# Altium PCB CubliV2PCB.PcbDoc (part 1 of 2)
Units mm, origin at the board's own origin, x right, y up, seen from the top; angles counter-clockwise.
Board outline 85.09 x 80.51 mm, 2 copper layers (Top Layer, Bottom Layer); 107 components, 65 nets, 363 pads, 141 vias.
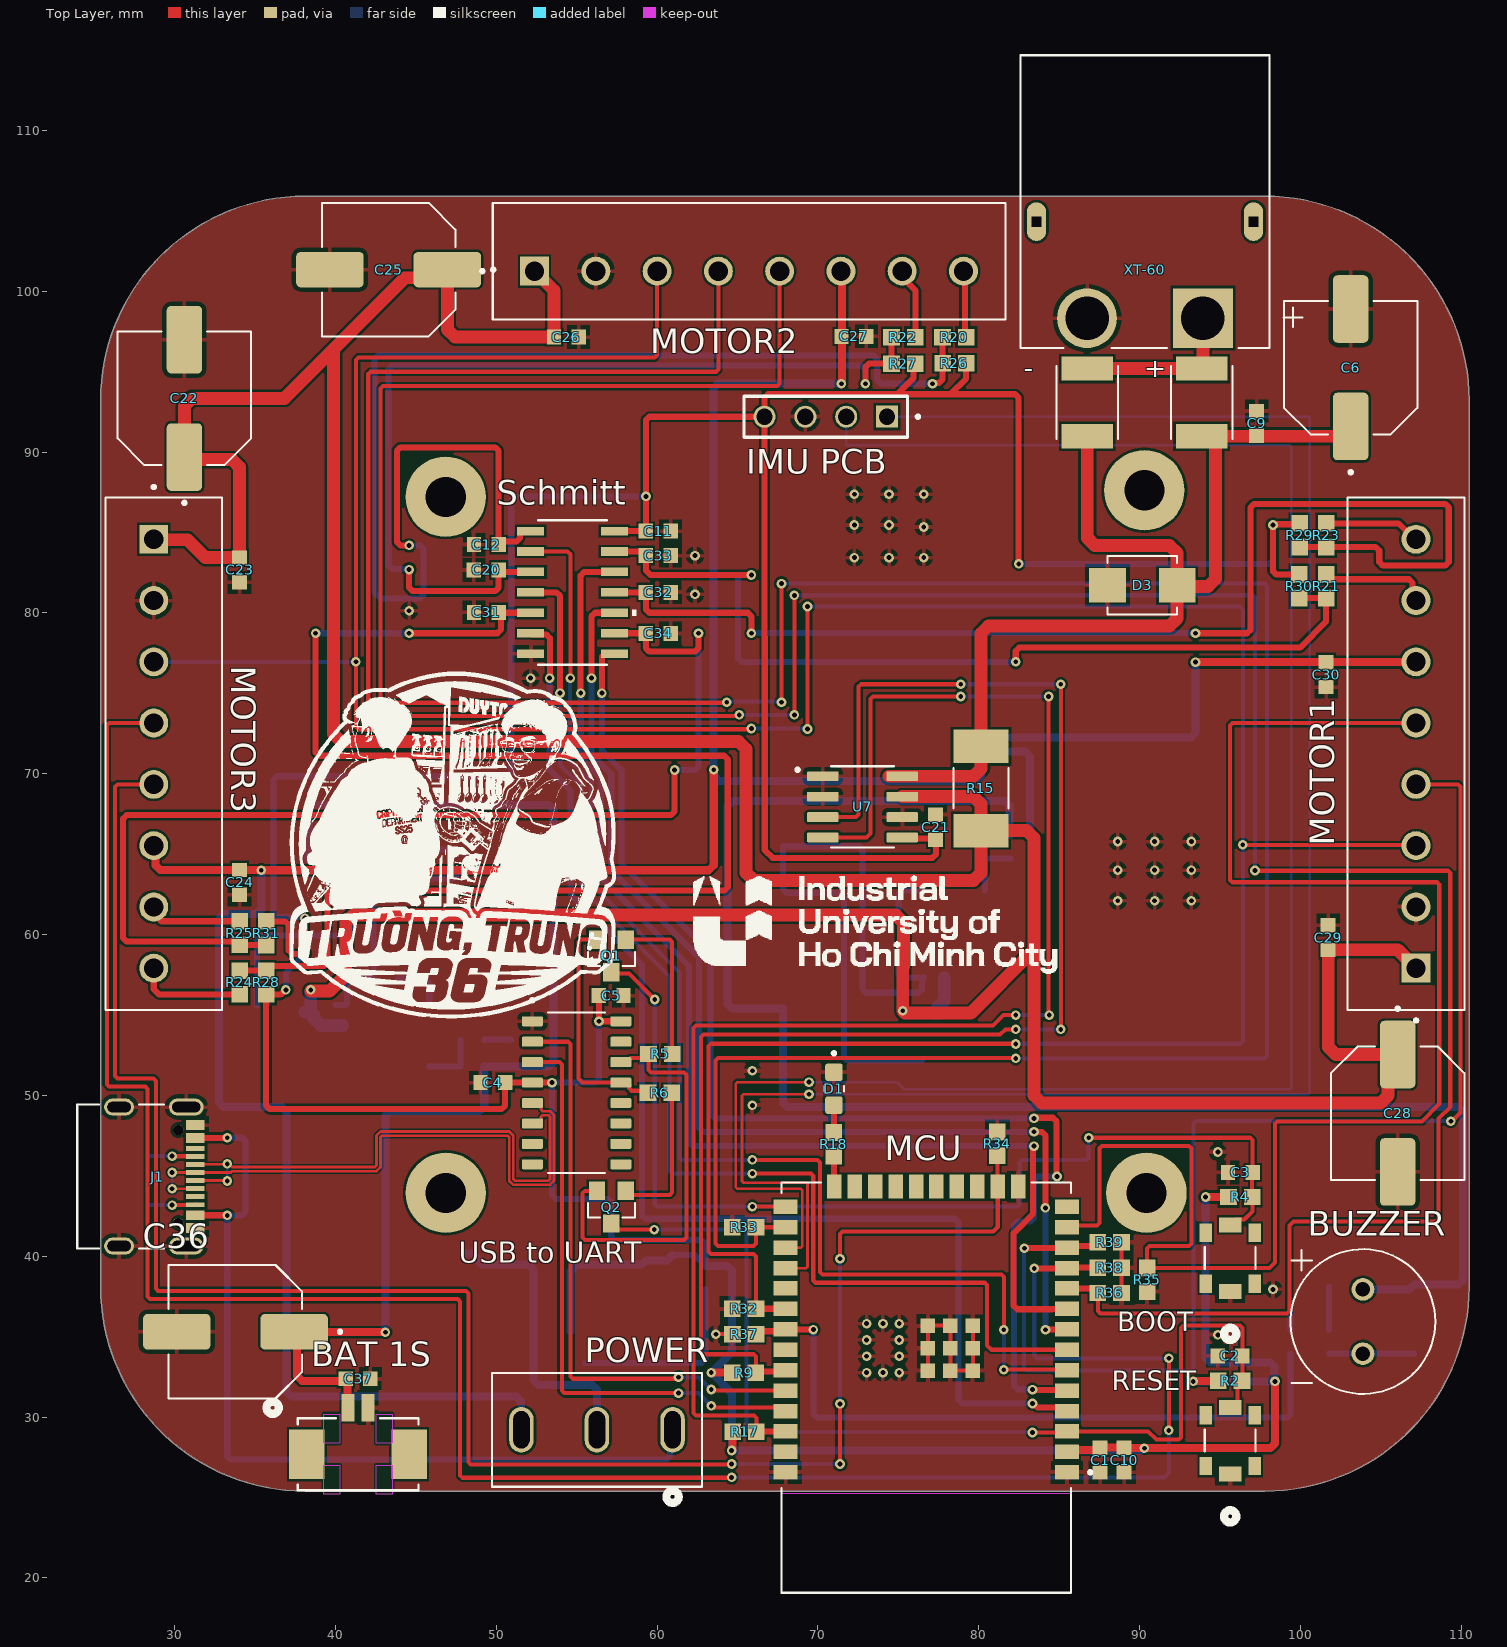
[diagram p0: Top Layer view]
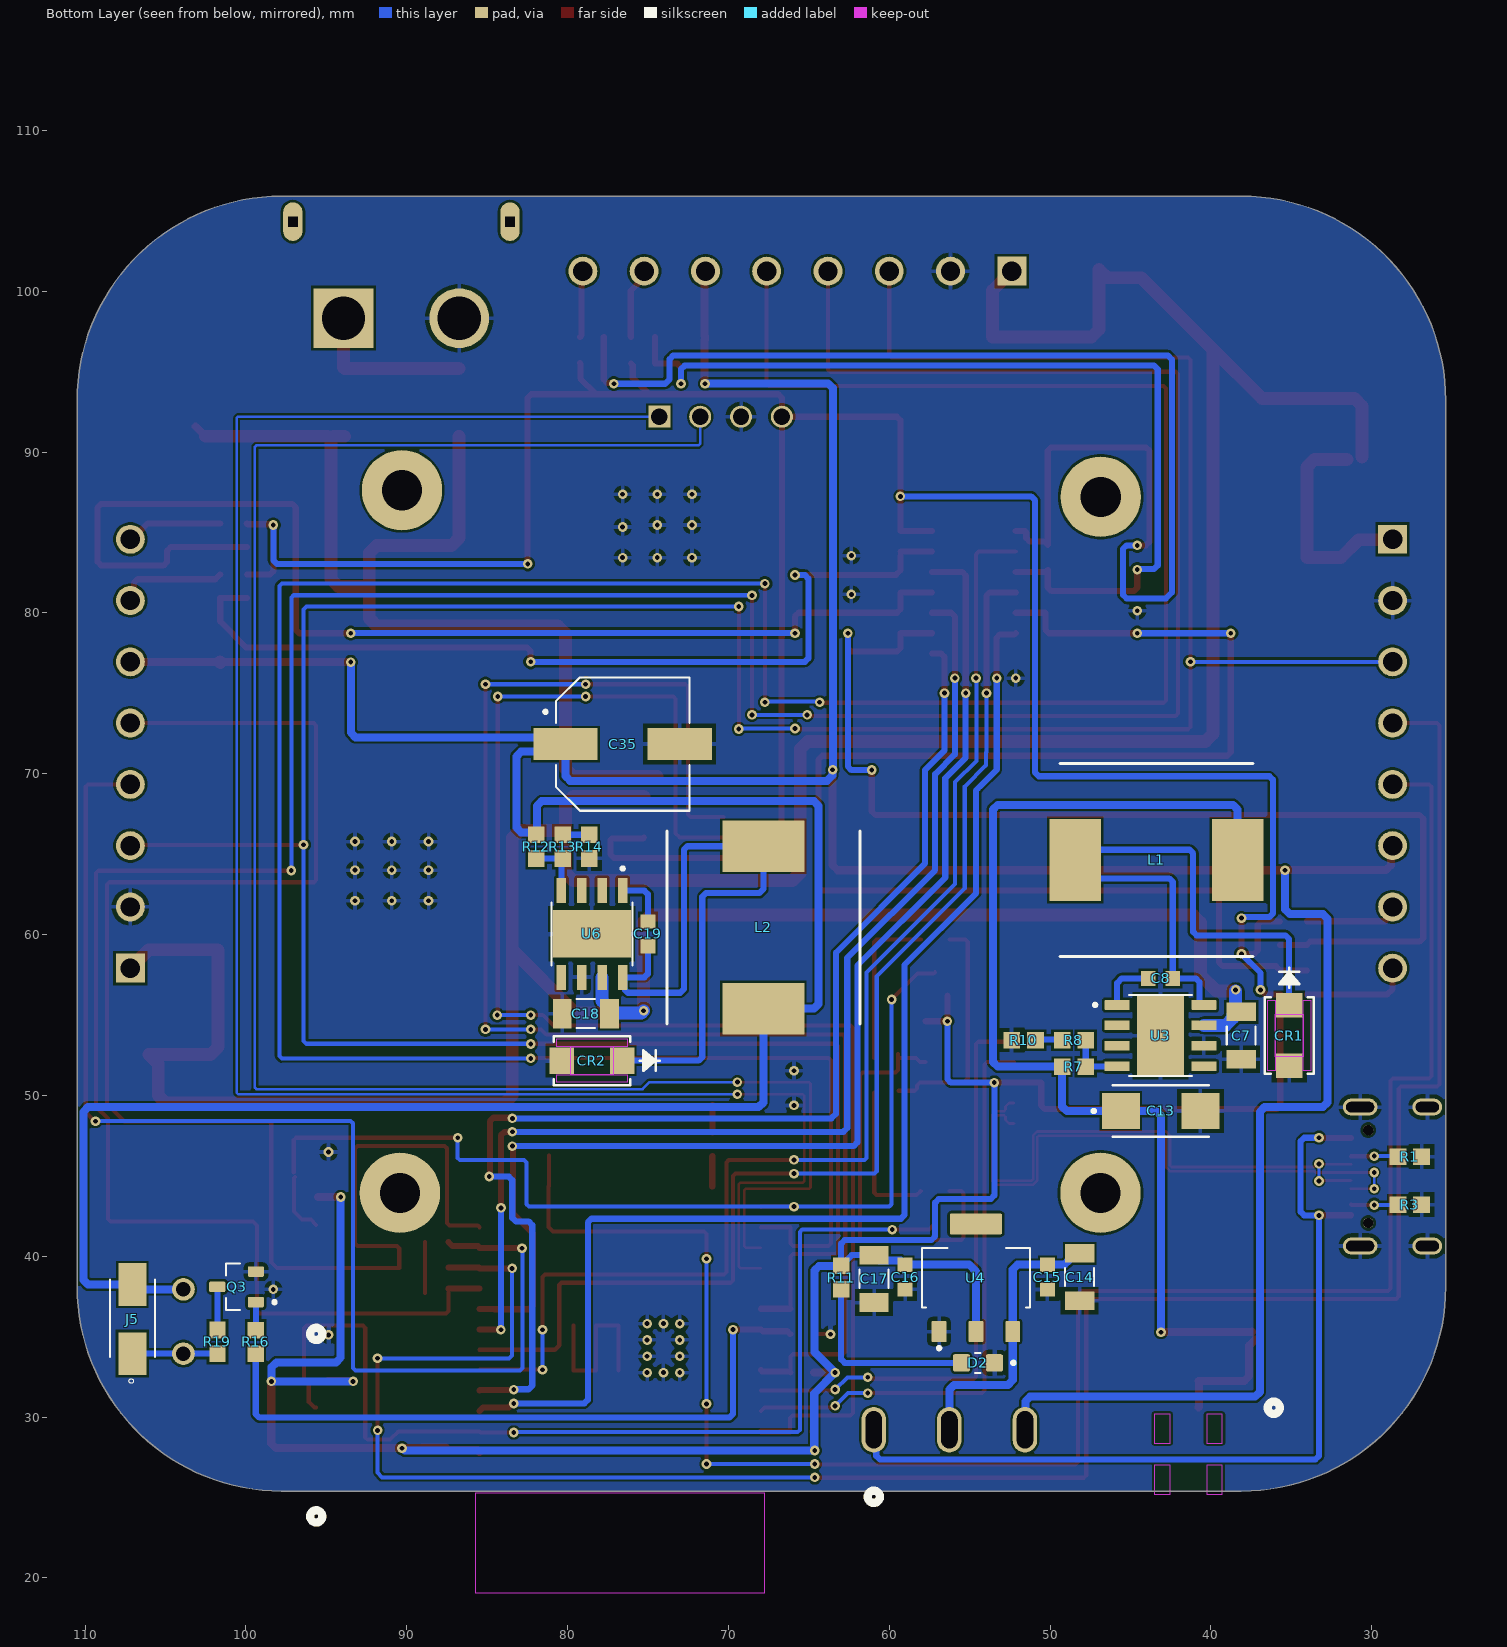
[diagram p1: Bottom Layer view, seen from below]
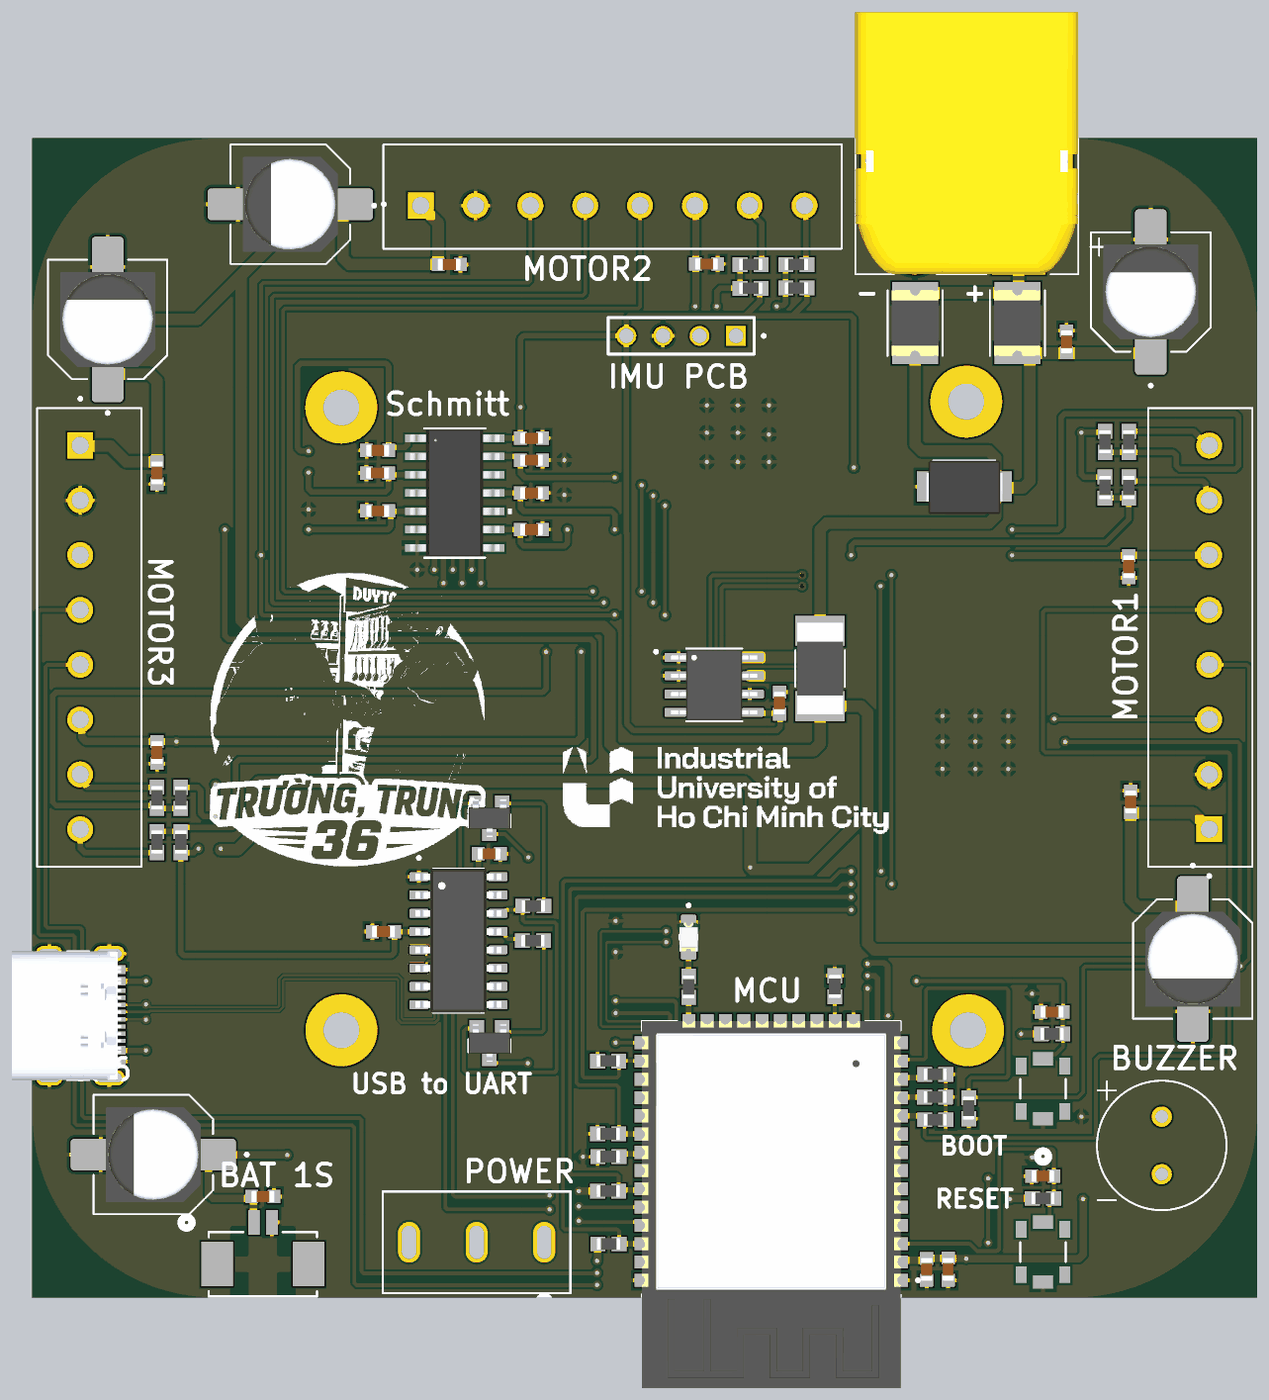
[diagram p2: 3D render of the assembled board from above, using the file's embedded part models]
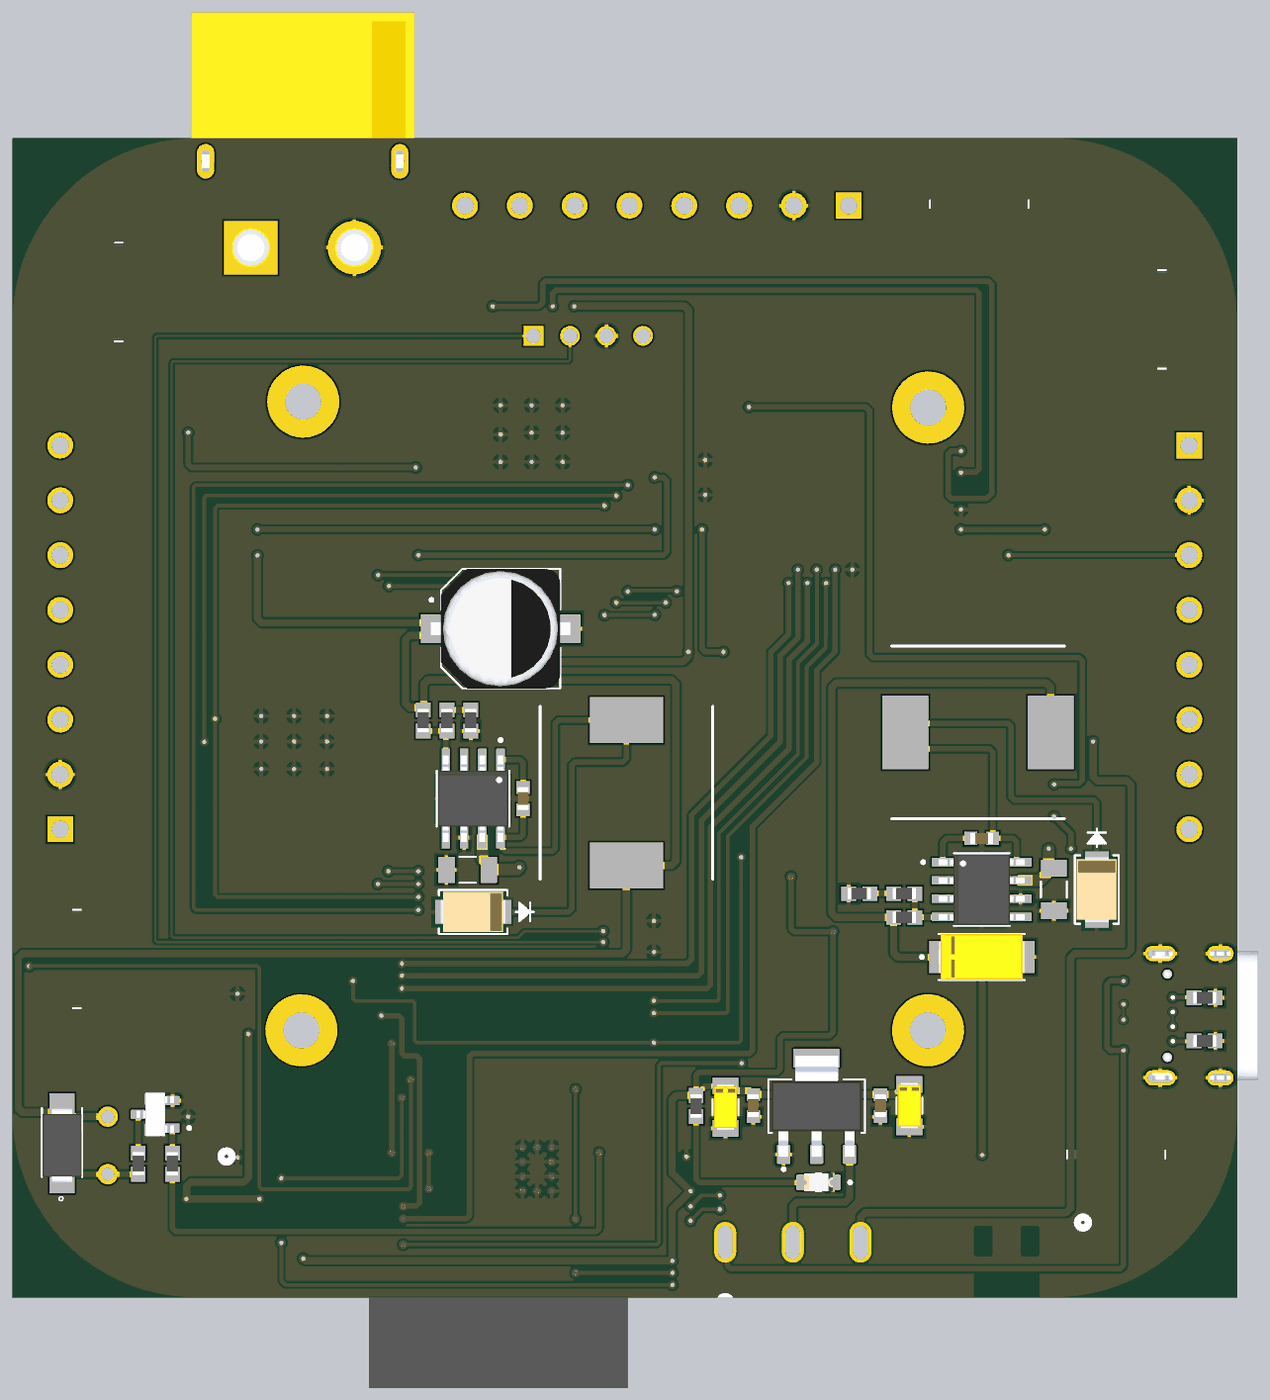
[diagram p3: 3D render of the assembled board from below, using the file's embedded part models]

## Layer stack, top to bottom
Top Solder: solder mask 0.0102, Solder Resist, Dk 3.5
Top Layer: signal copper 0.0356
Dielectric 1: dielectric 0.32, FR-4, Dk 4.8
Bottom Layer: signal copper 0.0356
Bottom Solder: solder mask 0.0102, Solder Resist, Dk 3.5

## Board outline
38.1,25.4 97.79,25.4 ccw(c97.79,38.1) 110.49,38.1 110.49,93.218 ccw(c97.797,93.218) 97.797,105.911 38.093,105.911 ccw(c38.093,93.218) 25.4,93.218 25.4,38.1 ccw(c38.1,38.1)

## Design rules (kind name [scope] priority, off if disabled: settings)
Clearance DiffpairClearance [InDifferentialPair('USB')] p1: gap=0.083 ignorepadtopadclearanceinfootprint=FALSE
Clearance SignalClearance [Not(InDifferentialPair('USB'))] p2: gap=0.15 ignorepadtopadclearanceinfootprint=FALSE
DiffPairsRouting [All] p1: maxlimit=0.083 minlimit=0.083 mostfreqgap=0.083 toplayer_minwidth=0.17 toplayer_maxwidth=0.17 toplayer_prefwidth=0.17 bottomlayer_minwidth=0.17 bottomlayer_maxwidth=0.17 bottomlayer_prefwidth=0.17 impedanceprofiledriven=TRUE impedanceprofileid={630FC3B4-62B8-4105-8E13-0E606457B353} impedanceprofilevalue=90.000000 maxuncoupledlength=12.7
HoleSize [All] p1: absolutevalues=TRUE maxlimit=3.5 minlimit=0.025 maxpercent=80.000 minpercent=20.000
HoleToHoleClearance [All] p1: gap=0.1 allowstackedmicrovias=TRUE
MinimumSolderMaskSliver [All] p1: minsoldermaskwidth=0.1
PolygonConnect [All] p1: connectstyle=Relief reliefconductorwidth=0.254 reliefentries=4 polygonreliefangle="90 Angle" airgapwidth=0.254
RoutingVias [All] p1: holewidth=0.711 width=1.27 viastyle="Through Hole" minholewidth=0.711 minwidth=1.27 maxholewidth=0.711 maxwidth=1.27
SilkToSolderMaskClearance [IsPad] p1: minsilkscreentomaskgap=0.1 clearancetoexposedcopper=TRUE
SolderMaskExpansion ViaTenting [IsVia] p1: expansion=0.102 istentingtop=TRUE
SolderMaskExpansion [All] p2: expansion=0.102 istentingtop=FALSE
Width Pow [InNet('+12')or InNet('+12_LOAD')or InNet('+3.3_MCU')or InNet('+4')or InNet('+5')or InNet('POWER')or InNet('NetF1_2')] p1: maxlimit=0.8 minlimit=0.254 preferedwidth=0.38 minimp=50.000000 maximp=50.000000 favimp=50.000000
Width Signal [Not(InNet('+12')or InNet('+12_LOAD')or InNet('+3.3_MCU')or InNet('+4')or InNet('+5')or InNet('POWER')or InNet('NetF1_2'))] p2: maxlimit=0.38 minlimit=0.152 preferedwidth=0.254 minimp=50.000000 maximp=50.000000 favimp=50.000000
25 further rules are at their usual default settings.

## Classes and differential pairs
component class Power: 2 C7 C8 C13 C14 C15 C16 C17 C18 C19 C21 C35 CR1 CR2 D2 L1 L2 POWER R7 R8 R10 R11 R12 R13 R14 R15 U4 U6 U7
component class MCU: BOOT BUZZER C1 C2 C3 C4 C5 C10 C11 C12 C20 C31 C32 C34 D1 J1 J5 MCU Q1 Q2 Q3 R1 R2 R3 R4 R5 R6 R9 R16 R17 R18 R19 R20 R21 R22 R23 R24 R25 R26 R27 R28 R29 R30 R31 R32 R33 R34 R35 R36 R37 R38 R39 RESET Schmitt "USB to UART"
component class Connector: + - "BAT 1S" C6 C9 C22 C23 C24 C25 C26 C27 C28 C29 C30 C36 C37 D3 "IMU PCB" MOTOR1 MOTOR2 MOTOR3 XT-60
differential pair USB: +USB_P -USB_N

## Components (designator, comment, footprint, x,y, rotation, side; value= is the part's Value field where it differs from the comment)
+ "16V 2.5A" FUSER_MF-MSMF250/16X-2 93.853,93.091 r90 top (schematic designator F2)
- "16V 2.5A" FUSER_MF-MSMF250/16X-2 86.741,93.091 r90 top (schematic designator F1)
"BAT 1S" "2 Pin 1.25 SMD" CONN_532610001-SD_02_MOL 41.402,27.686 r180 top (schematic designator J7)
BOOT "BOOT" "PTS820 J25K SMTR LFS_CNK" 95.631,39.878 r90 top (schematic designator SW3)
BUZZER "Passive Buzzer 9mm" XDCR_AT-0927-TT-2-R 103.886,35.941 r0 top (schematic designator LS1)
C1 "100nF" CAPC1608X90N 87.55,27.323 r90 top
C2 "100nF" CAPC1608X90N 95.62,33.812 r0 top
C3 "100nF" CAPC1608X90N 96.266,45.212 r0 top
C4 "100nF" CAPC1608X90N 49.784,50.8 r0 top
C5 "10uF" CAPC1608X90N 57.138,56.206 r180 top
C6 "100uF" CAPAE830X1000N 103.124,95.25 r90 top
C7 "22uF 25V" CAPC3216X229N 38.115,53.724 r90 bottom
C8 "100nF" CAPC1608X90N 43.133,57.277 r0 bottom
C9 "100nF" CAPC1608X90N 97.274,91.788 r270 top
C10 "10uF" CAPC1608X90N 89.037,27.332 r90 top
C11 "100nF" CAPC1608X90N 60.071,85.09 r180 top
C12 "1nF" CAPC1608X90N 49.378,84.243 r180 top
C13 "220uF" CAPPM6032X280N 43.125,49.033 r180 bottom
C14 "10uF" CAPC3216X110N 48.161,38.709 r270 bottom
C15 "100nF" CAPC1608X90N 50.165,38.705 r90 bottom
C16 "100nF" CAPC1608X90N 59.014,38.709 r90 bottom
C17 "10uF" CAPC3216X110N 60.942,38.597 r270 bottom
C18 "22uF 25V" CAPC3216X229N 78.867,55.087 r180 bottom
C19 "100nF" CAPC1608X90N 75.004,60.043 r90 bottom
C20 "1nF" CAPC1608X90N 49.374,82.672 r180 top
C21 "100nF" CAPC1608X90N 77.309,66.678 r270 top
C22 "100uF" CAPAE830X1000N 30.607,93.345 r90 top
C23 "100nF" CAPC1608X90N 34.036,82.677 r90 top
C24 "100nF" CAPC1608X90N 34.036,63.246 r90 top
C25 "100uF" CAPAE830X1000N 43.307,101.346 r180 top
C26 "100nF" CAPC1608X90N 54.356,97.155 r180 top
C27 "100nF" CAPC1608X90N 72.239,97.195 r180 top
C28 "100uF" CAPAE830X1000N 106.045,48.895 r270 top
C29 "100nF" CAPC1608X90N 101.727,59.817 r270 top
C30 "100nF" CAPC1608X90N 101.596,76.161 r90 top
C31 "1nF" CAPC1608X90N 49.382,80.034 r180 top
C32 "1nF" CAPC1608X90N 60.071,81.28 r0 top
C33 "1nF" CAPC1608X90N 60.071,83.566 r0 top
C34 "1nF" CAPC1608X90N 60.071,78.732 r0 top
C35 "330uF" CAP_EEEFP1V101AP 76.581,71.851 r180 bottom
C36 "100uF" CAPAE830X1000N 33.782,35.306 r180 top
C37 "100nF" CAPC1608X90N 41.402,32.385 r180 top
CR1 "SSA34" CR_A34-E35AT_VIS 35.132,53.721 r270 bottom
CR2 "SSA34" CR_A34-E35AT_VIS 78.486,52.166 r0 bottom
D1 "MCU LED" LEDSC125X200X90-2N 70.993,50.419 r270 top
D2 "MCU LED" LEDSC125X200X90-2N 54.483,33.371 r0 bottom
D3 "SMBJ15A" DIOM4336X265N 90.17,81.724 r0 top
"IMU PCB" "FPGA Connector" SAMTEC_TSW-104-07-T-S-LL 74.295,92.202 r180 top (schematic designator J8)
J1 "USB Type-C" AMPHENOL_10155435-00011LF 26.543,44.958 r270 top
J5 "SS14" SMA 107.061,35.941 r90 bottom
L1 "22uH" INDPM120120X800N 43.387,64.643 r180 bottom
L2 "22uH" INDPM120120X800N 67.827,60.448 r270 bottom
MCU "ESP32-WROOM-32E_(4MB)" XCVR_ESP32-WROOM-32E_(4MB) 76.735,31.827 r180 top (schematic designator U1)
MOTOR1 "Motor 3" PHOENIX_1803484 110.188,55.312 r90 top (schematic designator J4)
MOTOR2 "Motor 1" PHOENIX_1803484 49.779,98.254 r0 top (schematic designator J2)
MOTOR3 "Motor 2" PHOENIX_1803484 25.702,87.182 r270 top (schematic designator J3)
POWER "MTS-103" MTS-103_JCV 60.961,29.21 r90 top (schematic designator SW1)
Q1 "S8050" SOT-23 57.15,58.674 r180 top
Q2 "S8050" SOT-23 57.15,43.053 r180 top
Q3 "MMBT3904" TRANS_MMBT3904 100.584,38.1 r0 bottom
R1 "5K1" RESC1607X60N 27.634,46.198 r0 bottom
R2 "10K" RESC1607X60N 95.631,32.258 r0 top
R3 "5K1" RESC1607X60N 27.634,43.211 r180 bottom
R4 "10K" RESC1607X60N 96.266,43.688 r0 top
R5 "10K" RESC1607X60N 60.198,52.578 r0 top
R6 "10K" RESC1607X60N 60.171,50.165 r0 top
R7 "10K" RESC1607X60N 48.515,51.788 r180 bottom
R8 "3K9" RESC1607X60N 48.516,53.434 r0 bottom
R9 "4K7" RESC1607X60N 65.405,32.766 r180 top
R10 "510" RESC1607X60N 51.646,53.436 r0 bottom
R11 "220" RESC1607X60N 62.992,38.678 r270 bottom
R12 "10K" RESC1607X60N 81.956,65.473 r270 bottom
R13 "3K" RESC1607X60N 80.305,65.473 r90 bottom
R14 "220" RESC1607X60N 78.654,65.473 r270 bottom
R15 "0.01" RESC6331X85N 80.137,69.088 r90 top
R16 "1K" RESC1607X60N 99.388,34.671 r90 bottom
R17 "4K7" RESC1607X60N 65.434,29.094 r0 top
R18 "220" RESC1607X60N 70.993,46.963 r90 top
R19 "51" RESC1607X60N 101.769,34.679 r270 bottom
R20 "1K" RESC1607X60N 78.486,97.155 r180 top
R21 "1K" RESC1607X60N 101.6,81.661 r90 top
R22 "1K" RESC1607X60N 75.311,97.155 r180 top
R23 "1K" RESC1607X60N 101.6,84.836 r90 top
R24 "1K" RESC1607X60N 34.036,57.023 r90 top
R25 "1K" RESC1607X60N 34.036,60.098 r90 top
R26 "10K" RESC1607X60N 78.487,95.528 r180 top
R27 "10K" RESC1607X60N 75.311,95.504 r180 top
R28 "10K" RESC1607X60N 35.687,57.023 r90 top
R29 "10K" RESC1607X60N 99.949,84.836 r270 top
R30 "10K" RESC1607X60N 99.935,81.661 r270 top
R31 "10K" RESC1607X60N 35.693,60.09 r270 top
R32 "10K" RESC1607X60N 65.41,36.743 r180 top
R33 "10K" RESC1607X60N 65.407,41.807 r180 top
R34 "10K" RESC1607X60N 81.153,46.99 r90 top
R35 "10K" RESC1607X60N 90.468,38.53 r270 top
R36 "10K" RESC1607X60N 88.138,37.719 r0 top
R37 "10K" RESC1607X60N 65.417,35.16 r180 top
R38 "10K" RESC1607X60N 88.134,39.297 r0 top
R39 "10K" RESC1607X60N 88.141,40.878 r0 top
RESET "RESET" "PTS820 J25K SMTR LFS_CNK" 95.631,28.532 r90 top (schematic designator SW2)
Schmitt "74LVC14AD" SOT108-1_NXP 54.737,81.28 r0 top (schematic designator U5)
U3 "TPS5430" CONV_TPS5430DDAR 43.133,53.721 r180 bottom
U4 "AMS1117-3.3" SOT229P700X180-4N 54.61,38.662 r180 bottom
U6 "TPS5430" CONV_TPS5430DDAR 78.486,60.04 r270 bottom
U7 "INA219AIDR" SOIC127P599X175-8N 72.771,67.945 r0 top
"USB to UART" "CH340C" SOIC127P600X180-16N 54.991,50.165 r0 top (schematic designator U2)
XT-60 "XT60PW-M" AMASS_XT60PW-M 90.334,104.329 r180 top (schematic designator J6)

## Footprints (in the part's own frame and the unit in brackets; to place one, negate y for a bottom-side part, rotate by r counter-clockwise, add the part's x,y. Pads: shape width x height; smd on the part's side, far side on the other; paste and mask are expansions set on the pad)
AMASS_XT60PW-M [mm]
  rect 3.716x3.716 / inner round 3.716 / far side rect 3.716x3.716 hole 2.7 mask+0.102: 1(-3.6,6)
  round 3.716 hole 2.7 mask+0.102: 2(3.6,6)
  oval 1.2x2.4 hole 0.6 square mask+0.102: SH1(-6.75,0) SH2(6.75,0)
  silkscreen extent -9.8,-10.35 7.75,7.85, body extent -7.75,-10.35 7.75,7.85, height 8.4
AMPHENOL_10155435-00011LF [mm]
  rect 0.6x1.15 smd: A1_B12(-3.2,4.745) A4_B9(-2.4,4.745) B1_A12(3.2,4.745) B4_A9(2.4,4.745)
  rect 0.3x1.15 smd: A5(-1.25,4.745) A6(-0.25,4.745) A7(0.25,4.745) A8(1.25,4.745) B5(1.75,4.745) B6(0.75,4.745) B7(-0.75,4.745) B8(-1.75,4.745)
  oval 1.05x2.15 hole 0.65 slot 1.75 at 90 deg: SH1(-4.32,4.18) SH2(4.32,4.18)
  oval 1.05x1.85 hole 0.65 slot 1.45 at 90 deg: SH3(-4.32,0) SH4(4.32,0)
  round 0.65 hole 0.65 unplated: ""(-2.89,3.68) ""(2.89,3.68)
  silkscreen extent -4.47,-2.6 4.47,2.79, body extent -4.47,-2.6 4.47,5, height 3.26
CAP_EEEFP1V101AP [mm]
  rect 4x2 smd paste+0 mask+0.102: 1(-3.55,0) 2(3.55,0)
  silkscreen extent -4.9,-4.15 4.15,4.15, body extent -4.85,-4.15 4.85,4.15, height 10.2
CAPAE830X1000N [mm]
  rrect25% 4.2x2.2 smd: 1(-3.65,0) 2(3.65,0)
  silkscreen extent -6.6,-4.15 4.15,4.15, body extent -3.5,-3.3 3.5,3.3, height 7.55
CAPC1608X90N [mm]
  rect 0.89x0.93 smd: 1(-0.77,0) 2(0.77,0)
  body extent -0.8,-0.4 0.8,0.4, height 0.9
CAPC3216X110N [mm]
  rect 1.16x1.82 smd: 1(-1.475,0) 2(1.475,0)
  silkscreen extent -0.57,-0.9 0.57,0.9, body extent -1.6,-0.8 1.6,0.8, height 1.8
CAPC3216X229N [mm]
  rect 1.16x1.82 smd: 1(-1.475,0) 2(1.475,0)
  silkscreen extent -0.57,-0.9 0.57,0.9
CAPPM6032X280N [mm]
  rect 2.37x2.21 smd paste+0 mask+0.102: 1(-2.475,0) 2(2.475,0)
  silkscreen extent -4.26,-1.6 3,1.6, body extent -3,-1.6 3,1.6, height 2.8
CONN_532610001-SD_02_MOL [mil]
  rect 32x67 smd paste+0 mask+4.02: 1(24.61,-114.35) 2(-24.61,-114.35)
  rect 87x122 smd paste+0 mask+4.02: 3(-125,-0.18) 4(125,-0.18)
  Keep-Out Layer region: 83.48,-98.67 44.48,-98.67 44.48,-27.67 83.48,-27.67
  Keep-Out Layer region: -44.48,-98.67 -83.48,-98.67 -83.48,-27.67 -44.48,-27.67
  Keep-Out Layer region: 83.48,27.32 44.48,27.32 44.48,98.32 83.48,98.32
  Keep-Out Layer region: -44.48,27.32 -83.48,27.32 -83.48,98.32 -44.48,98.32
  silkscreen extent -148,-129 224,88
CONV_TPS5430DDAR [mm]
  rrect10% 1.55x0.6 smd mask+0: 1(-2.7,1.905) 2(-2.7,0.635) 3(-2.7,-0.635) 4(-2.7,-1.905) 5(2.7,-1.905) 6(2.7,-0.635) 7(2.7,0.635) 8(2.7,1.905)
  rect 2.95x4.9 smd paste-3 mask+0: 9(0,0)
  silkscreen extent -4.17,-2.52 1.95,2.52, body extent -3,-2.45 3,2.45, height 1.7
CR_A34-E35AT_VIS [mil]
  rect 60x65 smd paste+0 mask+0: 1(-74.02,0) 2(74.02,0)
  Top Layer keep-out region: -52.02,-34.5 -52.02,34.5 52.02,34.5 52.02,-34.5
  Top Layer keep-out region: -86.5,34.5 -86.5,53 86.5,53 86.5,34.5
  Top Layer keep-out region: -86.5,-53 -86.5,-34.5 86.5,-34.5 86.5,-53
  silkscreen extent -166,-60 94,60, body extent -89,-55 89,55, height 92
DIOM4336X265N [mm]
  rect 2.28x2.12 smd paste+0 mask+0.102: 1(-2.165,0) 2(2.165,0)
  silkscreen extent -2.16,-1.81 2.16,1.81, body extent -2.7,-1.9 2.7,1.8, height 2.19
FUSER_MF-MSMF250/16X-2 [mm]
  rect 1.5x3.2 smd: 1(-2.1,0) 2(2.1,0)
  silkscreen extent -2.27,-1.91 2.27,1.91, body extent -2.27,-1.62 2.27,1.62, height 0.85
INDPM120120X800N [mm]
  rect 3.2x5.1 smd: 1(-5.05,0) 2(5.05,0)
  silkscreen extent -6,-6 6,6
LEDSC125X200X90-2N [mm]
  rrect25% 1.07x1.08 smd: A(1.025,0) C(-1.025,0)
  silkscreen extent -2.3,-0.63 0.17,0.63, body extent -1,-0.63 1,0.63, height 0.7
MTS-103_JCV [mil]
  oval 111x60 hole 40 slot 91 at 0 deg paste+0 mask+0: 1(0,0) 2(0,185.04) 3(0,370.08)
  silkscreen extent -179,-72 139,442
PHOENIX_1803484 [mm]
  rect 1.8x1.8 / inner round 1.8 / far side rect 1.8x1.8 hole 1.2: 01(2.6,3)
  round 1.8 hole 1.2: 02(6.41,3) 03(10.22,3) 04(14.03,3) 05(17.84,3) 06(21.65,3) 07(25.46,3) 08(29.27,3)
  silkscreen extent -0.75,0 31.87,7.25
"PTS820 J25K SMTR LFS_CNK" [mil]
  rect 37x55 smd paste+0 mask+0: 1(-81.69,0) 2(81.69,0)
  rect 45x30 smd paste+0 mask+0: 3(-62.01,60.04) 4(62.01,60.04) 5(-62.01,-60.04) 6(62.01,-60.04)
  silkscreen extent -200,-62 26,62
RESC1607X60N [mm]
  rect 1.04x1.02 smd: 1(-0.735,0) 2(0.735,0)
  body extent -0.8,-0.4 0.8,0.4, height 0.55
RESC6331X85N [mm]
  rect 2.08x3.44 smd: 1(-2.616,0) 2(2.616,0)
  silkscreen extent -1.26,-1.72 1.26,1.72, body extent -3.17,-1.59 3.17,1.59, height 0.85
SAMTEC_TSW-104-07-T-S-LL [mm]
  rect 1.37x1.37 hole 1.02: 01(0,0)
  round 1.37 hole 1.02: 02(2.54,0) 03(5.08,0) 04(7.62,0)
  silkscreen extent -2.02,-1.27 8.89,1.27
SMA [mm]
  rect 2.65x1.75 smd paste+0 mask+0.102: P1(-2,0) P2(2.3,0)
  silkscreen extent -3.84,-1.4 2.6,1.4, body extent -2.6,-1.36 2.6,1.36, height 2.5
SOIC127P599X175-8N [mm]
  rrect25% 1.97x0.6 smd paste+0 mask+0.102: 1(-2.47,1.905) 2(-2.47,0.635) 3(-2.47,-0.635) 4(-2.47,-1.905) 5(2.47,-1.905) 6(2.47,-0.635) 7(2.47,0.635) 8(2.47,1.905)
  silkscreen extent -4.14,-2.52 1.95,2.52, body extent -3,-2.45 3,2.45, height 1.75
SOIC127P600X180-16N [mm]
  rrect25% 1.31x0.62 smd: 1(-2.75,4.445) 2(-2.75,3.175) 3(-2.75,1.905) 4(-2.75,0.635) 5(-2.75,-0.635) 6(-2.75,-1.905) 7(-2.75,-3.175) 8(-2.75,-4.445) 9(2.75,-4.445) 10(2.75,-3.175) 11(2.75,-1.905) 12(2.75,-0.635) 13(2.75,0.635) 14(2.75,1.905) 15(2.75,3.175) 16(2.75,4.445)
  silkscreen extent -2.85,-5 1.78,5.85, body extent -3,-5 3,5, height 1.8
SOT108-1_NXP [mil]
  rect 66.56x20.97 smd paste+0 mask+0: 1(-102.5,150) 2(-102.5,100) 3(-102.5,50) 4(-102.5,0) 5(-102.5,-50) 6(-102.5,-100) 7(-102.5,-150) 8(102.5,-150) 9(102.5,-100) 10(102.5,-50) 11(102.5,0) 12(102.5,50) 13(102.5,100) 14(102.5,150)
  silkscreen extent -84,-177 156,177, body extent -122,-172 122,172, height 69
SOT229P700X180-4N [mm]
  rrect15% 0.93x1.31 smd: 1(-2.29,-3.345) 2(0,-3.345) 3(2.29,-3.345)
  rrect15% 3.24x1.31 smd: 4(0,3.345)
  silkscreen extent -3.36,-4.47 3.36,1.86, body extent -3.15,-3.5 3.15,3.5, height 1.8
SOT-23 [mil]
  rect 40x45 smd: 1(-35,-40) 2(35,-40) 3(0,40)
  silkscreen extent -58,-10 58,25, body extent -57,-51 57,51, height 55
TRANS_MMBT3904 [mm]
  rrect25% 1x0.65 smd paste+0 mask+0.102: 1(-1.2,0.95) 2(-1.2,-0.95) 3(1.2,0)
  silkscreen extent -2.46,-1.45 0.65,1.45, body extent -1.3,-1.52 1.3,1.52, height 1.3
XCVR_ESP32-WROOM-32E_(4MB) [mm]
  rect 1.5x0.9 smd: 1(-8.75,5.26) 2(-8.75,3.99) 3(-8.75,2.72) 4(-8.75,1.45) 5(-8.75,0.18) 6(-8.75,-1.09) 7(-8.75,-2.36) 8(-8.75,-3.63) 9(-8.75,-4.9) 10(-8.75,-6.17) 11(-8.75,-7.44) 12(-8.75,-8.71) 13(-8.75,-9.98) 14(-8.75,-11.25) 25(8.75,-11.25) 26(8.75,-9.98) 27(8.75,-8.71) 28(8.75,-7.44) 29(8.75,-6.17) 30(8.75,-4.9) 31(8.75,-3.63) 32(8.75,-2.36) 33(8.75,-1.09) 34(8.75,0.18) 35(8.75,1.45) 36(8.75,2.72) 37(8.75,3.99) 38(8.75,5.26)
  rect 0.9x1.5 smd: 15(-5.715,-12.5) 16(-4.445,-12.5) 17(-3.175,-12.5) 18(-1.905,-12.5) 19(-0.635,-12.5) 20(0.635,-12.5) 21(1.905,-12.5) 22(3.175,-12.5) 23(4.445,-12.5) 24(5.715,-12.5)
  rect 0.9x0.9 smd: 39_1(-2.9,-1.06) 39_2(-1.5,-1.06) 39_3(-0.1,-1.06) 39_4(-2.9,-2.46) 39_5(-1.5,-2.46) 39_6(-0.1,-2.46) 39_7(-2.9,-3.86) 39_8(-1.5,-3.86) 39_9(-0.1,-3.86)
  Keep-Out Layer region: 9,6.56 -9,6.56 -9,12.75 9,12.75
  silkscreen extent -10.3,-12.75 9,12.75, body extent -9,-12.75 9,12.75, height 3.25
XDCR_AT-0927-TT-2-R [mm]
  round 1.408 hole 0.9: N(0,-2) P(0,2)
  silkscreen extent -4.5,-4.5 4.5,4.5

## Part data
+ -: library part MF-MSMF250/16X-2, "Polymeric PTC Resettable Fuse 16V 2.5 A Ih Surface Mount 1812 (4532 Metric), Concave", Package="1812 Bourns", Availability="In Stock", Check_prices=https://www.snapeda.com/parts/MF-MSMF250/16X-2/Bourns/view-part/?ref=eda, MF=Bourns, MP=MF-MSMF250/16X-2, Price=None, Purchase-URL=https://pricing.snapeda.com/search/part/MF-MSMF250/16X-2/?ref=eda, SnapEDA_Link=https://www.snapeda.com/parts/MF-MSMF250/16X-2/Bourns/view-part/?ref=snap
"BAT 1S": library part 532610271, "Connector Header Surface Mount, Right Angle 2 position 0.049 (1.25mm)", Package=None, Check_prices=https://www.snapeda.com/parts/532610271/Molex/view-part/?ref=eda, MF=Molex, MP=532610271, SnapEDA_Link=https://www.snapeda.com/parts/532610271/Molex/view-part/?ref=snap
BOOT RESET: library part "PTS820 J25K SMTR LFS", "Description", Manufacturer_Name="C&K Components", Copyright="Copyright (C) 2026 Ultra Librarian. All rights reserved.", Manufacturer_Part_Number="PTS820 J25K SMTR LFS", RefDes=RefDes, Type=Type
BUZZER: library part AT-0927-TT-2-R, "AUDIO TRANSDUCER 3VP-P 70MA 20OHM 86DBA", Package=None, Availability=Unavailable, MF="{'manufacturer': u'PUI Audio, Inc.'}", MP=AT-0927-TT-2-R, Price=None
C1 C2 C3 C4 C5 C8 C9 C10 C11 C15 C16 C19 C21 C23 C24 C26 C27 C29 C30 C37: library part GRM188R71H104KA93D, "SMD Capacitor X7R(EIA) with Capacitance: 0.10uF Tol. 10%. Rated Voltage: 50Vdc", Package="1608 Murata", Check_prices=https://www.snapeda.com/parts/GRM188R71H104KA93D/Murata/view-part/?ref=eda, MF=Murata, MP=GRM188R71H104KA93D, SnapEDA_Link=https://www.snapeda.com/parts/GRM188R71H104KA93D/Murata/view-part/?ref=snap
C6 C22 C25 C28 C36: library part UWT1V101MCL1GS, "Capacitor Aluminum Electrolytic, 1000h 6.3 (Dia.) x 7.7mm, 100uF, 35V, WT Series", Package="Radial Nichicon", Check_prices=https://www.snapeda.com/parts/UWT1V101MCL1GS/Nichicon/view-part/?ref=eda, MF=Nichicon, MP=UWT1V101MCL1GS, SnapEDA_Link=https://www.snapeda.com/parts/UWT1V101MCL1GS/Nichicon/view-part/?ref=snap
C7 C18: library part 12063D226KAT2A, Package=None, Availability=Unavailable, MF="{'manufacturer': u'KYOCERA AVX'}", MP=12063D226KAT2A, Price=None
C12 C20 C31 C32 C33 C34: library part GRM188R71H102KA01D, "SMD Capacitor X7R(EIA) with Capacitance: 1000pF Tol. 10%. Rated Voltage: 50Vdc", Package="1608 Murata", Check_prices=https://www.snapeda.com/parts/GRM188R71H102KA01D/Murata/view-part/?ref=eda, MF=Murata, MP=GRM188R71H102KA01D, SnapEDA_Link=https://www.snapeda.com/parts/GRM188R71H102KA01D/Murata/view-part/?ref=snap
C13: library part T493C227K006CH6410, "220 ÂµF Molded Tantalum Capacitors 6.3 V 2312 (6032 Metric) 1.2Ohm @ 100kHz", Package="SMD-2 Kemet", Check_prices=https://www.snapeda.com/parts/T493C227K006CH6410/Kemet/view-part/?ref=eda, MF=Kemet, MP=T493C227K006CH6410, SnapEDA_Link=https://www.snapeda.com/parts/T493C227K006CH6410/Kemet/view-part/?ref=snap
C14 C17: library part T491A106K010AT7280, "10 ÂµF Molded Tantalum Capacitors 10 V 1206 (3216 Metric) 3.8Ohm", Package="SMD-2 KEMET", Check_prices=https://www.snapeda.com/parts/T491A106K010AT7280/KEMET/view-part/?ref=eda, MF=KEMET, MP=T491A106K010AT7280, SnapEDA_Link=https://www.snapeda.com/parts/T491A106K010AT7280/KEMET/view-part/?ref=snap
C35: library part EEEFP1V101AP, "100ÂµF 35V Aluminum Electrolytic Capacitors Radial, Can - SMD 80mOhm @ 100kHz 2000 Hrs @ 105Â°C", Package="RADIAL-2 Panasonic", Check_prices=https://www.snapeda.com/parts/EEE-FP1V101AP/Panasonic/view-part/?ref=eda, MF="Panasonic Electronic", MP=EEE-FP1V101AP, SnapEDA_Link=https://www.snapeda.com/parts/EEE-FP1V101AP/Panasonic/view-part/?ref=snap
CR1 CR2: library part SSA34-E35AT, "3A,40V,SMA SKY RECT", Manufacturer_Name=Vishay, Manufacturer_Part_Number=SSA34-E3/5AT, Copyright="Copyright (C) 2026 Ultra Librarian. All rights reserved."
D1 D2: library part 5990110007F, "Red 633nm LED Indication - Discrete 2.1V 0805 (2012 Metric)", Package="0805 Dialight", Availability="In Stock", Check_prices=https://www.snapeda.com/parts/599-0110-007F/Dialight/view-part/?ref=eda, MF=Dialight, MP=599-0110-007F, Price=None, Purchase-URL=https://pricing.snapeda.com/search/part/599-0110-007F/?ref=eda, SnapEDA_Link=https://www.snapeda.com/parts/599-0110-007F/Dialight/view-part/?ref=snap
D3: "600W, 17.6V, 5%, Unidirectional, TVS", Package="SMD-2 Taiwan Semiconductor", Check_prices=https://www.snapeda.com/parts/SMBJ15A/taiwan/view-part/?ref=eda, MF="Taiwan Semiconductor", MP=SMBJ15A, SnapEDA_Link=https://www.snapeda.com/parts/SMBJ15A/taiwan/view-part/?ref=snap
"IMU PCB": library part TSW-104-07-T-S-LL, Package=None, Availability=Unavailable, MP=TSW-104-07-T-S-LL, Price=None
J1: library part 10155435-00011LF, Package=None, Availability=Unavailable, MP=10155435-00011LF, Price=None
J5: "Diode Schottky 40 V 1A Surface Mount DO-214AC (SMA)", Package="SMA-2 ON Semiconductor", Check_prices=https://www.snapeda.com/parts/SS14/Onsemi/view-part/?ref=eda, MF=onsemi, MP=SS14, SnapEDA_Link=https://www.snapeda.com/parts/SS14/Onsemi/view-part/?ref=snap
L1 L2: library part CDRH127_LDNP-221MC, "220 ÂµH Shielded - Inductor 1.45 A 338mOhm Max Nonstandard", Package="Nonstandard Sumida", Check_prices=https://www.snapeda.com/parts/CDRH127/LDNP-221MC/Sumida+America+Components+Inc./view-part/?ref=eda, MF="Sumida America", MP=CDRH127/LDNP-221MC, SnapEDA_Link=https://www.snapeda.com/parts/CDRH127/LDNP-221MC/Sumida+America+Components+Inc./view-part/?ref=snap
MCU: "Bluetooth, WiFi 802.11b/g/n, Bluetooth v4.2 +EDR, Class 1, 2 and 3 Transceiver Module 2.4GHz ~ 2.5GHz Integrated, Trace Surface Mount", Package="SMD-44 Espressif Systems", Check_prices=https://www.snapeda.com/parts/ESP32-WROOM-32E%20(4MB)/Espressif+Systems/view-part/?ref=eda, MF="Espressif Systems", MP="ESP32-WROOM-32E (4MB)", SnapEDA_Link=https://www.snapeda.com/parts/ESP32-WROOM-32E%20(4MB)/Espressif+Systems/view-part/?ref=snap
MOTOR1 MOTOR2 MOTOR3: library part 1803484, Package=None, Availability=Unavailable, MF="{'manufacturer': u'Phoenix Contact'}", MP=1803484, Price=None
POWER: "Description", Manufacturer_Name="Jameco Valuepro", Copyright="Copyright (C) 2026 Ultra Librarian. All rights reserved.", Manufacturer_Part_Number=MTS-103, RefDes=RefDes, Type="Toggle Switches"
Q1 Q2: library part SMD-TRANSISTORS-NPN-25V-500MW(SOT-23), "Bipolar (BJT) Transistor NPN 25 V 500 mA 150MHz 300 mW Surface Mount SOT-23", Package=None, Availability="In Stock", Check_prices=https://www.snapeda.com/parts/S8050/Umwelt+Sensor+Teknik/view-part/?ref=eda, MF=UMW, MP=S8050, Price=None, Purchase-URL=https://pricing.snapeda.com/search/part/S8050/?ref=eda, SnapEDA_Link=https://www.snapeda.com/parts/S8050/Umwelt+Sensor+Teknik/view-part/?ref=snap
Q3: "BJT, SOT-23, 40V, 200mA, NPN, 0.35W, 150Â°C", Package="SOT-23 Diotec", Check_prices=https://www.snapeda.com/parts/MMBT3904/Diotec/view-part/?ref=eda, MF="Diotec Semiconductor", MP=MMBT3904, SnapEDA_Link=https://www.snapeda.com/parts/MMBT3904/Diotec/view-part/?ref=snap
R1 R2 R3 R4 R5 R6 R7 R8 R9 R10 R11 R12 R13 R14 R16 R17 R18 R19 R20 R21 R22 R23 R24 R25 R26 R27 R28 R29 R30 R31 R32 R33 R34 R35 R36 R37 R38 R39: library part RC0603FR-071K2L, "1.2 kOhms Â±1% 0.1W, 1/10W Chip Resistor 0603 (1608 Metric) Moisture Resistant Thick Film", Package="SMD-2 Yageo", Check_prices=https://www.snapeda.com/parts/RC0603FR-071K2L/Yageo/view-part/?ref=eda, MF=Yageo, MP=RC0603FR-071K2L, SnapEDA_Link=https://www.snapeda.com/parts/RC0603FR-071K2L/Yageo/view-part/?ref=snap
R15: library part CSNL2512FT1L00, "1 mOhms Â±1% 2W Chip Resistor 2512 (6432 Metric) Current Sense, Moisture Resistant Metal Element", Package="6331 Stackpole", Check_prices=https://www.snapeda.com/parts/CSNL2512FT1L00/Stackpole+Electronics/view-part/?ref=eda, MF="Stackpole Electronics Inc", MP=CSNL2512FT1L00, SnapEDA_Link=https://www.snapeda.com/parts/CSNL2512FT1L00/Stackpole+Electronics/view-part/?ref=snap
Schmitt: "Description", Manufacturer_Name=NXP, Copyright="Copyright (C) 2026 Ultra Librarian. All rights reserved.", Manufacturer_Part_Number=74LVC14AD, RefDes=RefDes, Type=Type
U3 U6: library part TPS5430DDAR, "5.5V to 36V Input, 3A, 500kHz Step-Down Converter", Package="HSOIC-8 Texas Instruments", Availability="In Stock", Check_prices=https://www.snapeda.com/parts/TPS5430DDAR/Texas+Instruments/view-part/?ref=eda, MF="Texas Instruments", MP=TPS5430DDAR, Price=None, Purchase-URL=https://pricing.snapeda.com/search/part/TPS5430DDAR/?ref=eda, SnapEDA_Link=https://www.snapeda.com/parts/TPS5430DDAR/Texas+Instruments/view-part/?ref=snap
U4: "Linear Voltage Regulator IC Positive Fixed 1 Output 1A SOT-223-3L", Package="SOT-223-3L UMW", Check_prices=https://www.snapeda.com/parts/AMS1117-3.3/UMW/view-part/?ref=eda, MF=UMW, MP=AMS1117-3.3, SnapEDA_Link=https://www.snapeda.com/parts/AMS1117-3.3/UMW/view-part/?ref=snap
U7: "26-V 12-bit I2C output digital power monitor", Package="SOIC-8 Texas Instruments", Check_prices=https://www.snapeda.com/parts/INA219AIDR/Texas+Instruments/view-part/?ref=eda, MF="Texas Instruments", MP=INA219AIDR, SnapEDA_Link=https://www.snapeda.com/parts/INA219AIDR/Texas+Instruments/view-part/?ref=snap
"USB to UART": "USB to serial chip CH340", Package=None, Availability="Not in stock", Check_prices=https://www.snapeda.com/parts/CH340C/WCH/view-part/?ref=eda, MF=WCH, MP=CH340C, Price=None, SnapEDA_Link=https://www.snapeda.com/parts/CH340C/WCH/view-part/?ref=snap
XT-60: "Socket, DC supply, male, PIN: 2", Package=Package, Check_prices=https://www.snapeda.com/parts/XT60PW-M/AMASS/view-part/?ref=eda, MF=AMASS, MP=XT60PW-M, SnapEDA_Link=https://www.snapeda.com/parts/XT60PW-M/AMASS/view-part/?ref=snap

## Free pads (board coordinates)
  round 5 hole 2.5: 5(46.851,87.219) 5(46.863,43.942) 5(90.297,87.63) 5(90.424,43.942)

## Via types
v1: diameter 0.6, hole 0.3, Top Layer to Bottom Layer, tented both sides, 141 vias

## Nets (pads, with @x,y where several pads share a name; then routed paths per layer and width w, separated by ;. In a path a pad name is that pad's centre, name@x,y a point inside that pad or via, vN(x,y) a via of type N, cw(c..) or ccw(c..) an arc to the next point about the centre after c; other vN are vias at no path point)
+3.3_MCU: "IMU PCB.04" "USB to UART.4" "USB to UART.16" C1.2 C4.2 C5.2 C10.2 C11.2 C16.2 C17.1 C21.2 MCU.2 R2.1 R4.1 R9.2 R11.1 R17.1 R26.1 R27.1 R28.1 R29.1 R30.1 R31.1 Schmitt.14 U4.2 U7.5 | length 326.7
  Top Layer w0.38: R31.1 36.861,60.825 37.084,60.602 37.084,59.024 37.307,58.801 v1(38.1,58.801) v1(38.1,61.023) ; v1(36.917,56.564) 36.882,56.564 36.593,56.275 35.701,56.275 R28.1 35.687,49.372 35.91,49.149 50.323,49.149 50.546,49.372 50.546,50.792 C4.2 52.241,50.8 v1(53.467,50.8) ; C5.2 56.378,56.197 56.378,54.62 v1(56.388,54.61) 57.741,54.61 ; Schmitt.14 C11.2 59.301,91.979 59.524,92.202 66.675,92.202 ; U7.5 75.307,65.974 77.243,65.974 C21.2 77.343,65.874 77.343,64.993 77.12,64.77 67.183,64.77 66.695,65.258 66.695,78.491 66.675,78.511 66.675,92.202 ; R27.1 75.946,95.404 75.946,94.615 74.93,93.599 ; R26.1 79.208,95.514 79.208,94.575 78.232,93.599 ; v1(82.481,83.053) 82.481,93.376 82.259,93.599 78.232,93.599 ; C1.2 C1.2@87.554,28.098 ; C10.2@89.032,28.098 C10.2 C10.2@89.054,28.084 ; v1@90.28,28.084 v1(90.297,28.067) ; R30.1 99.92,82.381 98.506,82.381 98.298,82.589 v1(98.298,85.471) 98.34,85.513 99.891,85.513 R29.1 ; 66.675,92.202 66.675,93.376 66.898,93.599 74.93,93.599 ; 74.93,93.599 78.232,93.599
  Top Layer w0.5: v1@63.5,32.766 R9.2 ; v1@64.663,27.922 64.681,27.94 64.681,29.076 R17.1 ; MCU.2 85.615,27.967 87.423,27.967 C1.2 ; C1.2@87.554,28.098 C10.2@89.032,28.098 ; C10.2@89.054,28.084 v1@90.28,28.084 ; v1(90.297,28.067) 98.132,28.067 98.425,28.36 v1@98.425,32.258 ; v1@93.345,32.258 R2.1 ; v1(94.107,43.688) R4.1
  Bottom Layer w0.38: v1(36.917,56.564) 36.917,57.618 v1(38.1,58.801) ; v1@37.973,61.087 36.365,61.087 36.143,61.31 36.143,69.627 36.365,69.85 50.704,69.85 50.927,70.073 50.927,86.995 51.181,87.249 v1(59.309,87.249) ; v1(56.388,54.61) 56.388,51.023 56.165,50.8 v1(53.467,50.8) 53.467,43.784 53.69,43.561 56.927,43.561 57.15,43.338 57.15,41.235 57.373,41.012 62.769,41.012 62.992,40.79 R11.1@62.992,39.423 ; C17.1 62.343,40.072 R11.1@62.992,39.423 ; R11.1 R11.1@62.992,39.423 ; v1(82.481,83.053) 98.075,83.053 98.298,83.276 v1(98.298,85.471)
  Bottom Layer w0.5: U4.2 54.61,39.06 55.03,39.479 C16.2 59.034,39.479 59.296,39.742 60.612,39.742 C17.1 ; R11.1 62.997,39.408 64.357,39.408 64.649,39.115 64.649,34.042 v1@63.373,32.766 ; v1(90.297,28.067) 90.27,28.067 90.125,27.922 64.663,27.922 64.663,31.477 v1@63.373,32.766 ; v1(93.337,32.22) v1(98.417,32.22) 98.398,32.239 98.398,33.108 98.105,33.401 94.4,33.401 94.107,33.694 v1(94.107,43.688) ; v1@63.373,32.766 v1(63.365,32.766) v1@63.373,32.766
  other v1: 64.63,27.922
+4: "BAT 1S.1" C13.1 C36.1 C37.2 L1.2 R7.1 | length 74.2
  Top Layer w0.5: C36.1@37.246,34.831 37.619,34.458 37.619,32.551 37.911,32.258 40.777,32.258 40.746,32.227 40.746,30.622 40.777,30.591 ; C36.1 37.461,35.277 v1(43.101,35.277)
  Bottom Layer w0.5: L1.2 38.337,67.779 38.63,68.072 53.254,68.072 53.547,67.779 53.547,52.081 53.254,51.788 R7.1 49.25,49.315 48.958,49.022 C13.1@45.509,49.022 ; v1(43.101,35.277) 43.101,48.74 43.394,49.033 C13.1
+5: BUZZER.P C24.2 C27.2 C30.2 C35.1 J5.P2 L2.2 MOTOR1.06 MOTOR2.06 MOTOR3.06 POWER.3 R12.1 | length 297.1
  Top Layer w0.5: MOTOR3.06 28.812,65.422 28.812,64.309 29.105,64.016 C24.2 34.042,64.01 35.384,64.01 35.392,64.001 63.207,64.001 63.52,64.314 v1(63.52,70.248) ; MOTOR2.06 71.501,101.182 71.501,97.226 C27.2 71.469,97.011 71.501,96.98 v1@71.501,94.254 ; v1(93.478,76.943) 93.484,76.937 101.59,76.937 C30.2 ; C30.2@101.611,76.946 MOTOR1.06@107.172,76.946
  Top Layer w0.8: C30.2 C30.2@101.611,76.946 ; MOTOR1.06@107.172,76.946 MOTOR1.06
  Bottom Layer w0.5: v1(35.39,64.003) 35.39,61.573 35.097,61.28 33.043,61.28 32.75,60.987 32.75,49.569 33.043,49.276 36.664,49.276 36.957,48.983 36.957,31.56 37.25,31.267 51.247,31.267 51.539,30.974 51.539,29.232 POWER.3 ; v1@63.502,70.266 63.502,93.976 63.795,94.269 v1@71.41,94.269 ; v1(63.52,70.248) 63.539,70.229 63.539,69.888 63.863,69.564 79.838,69.564 80.131,69.857 C35.1 ; v1(93.478,76.943) 93.478,72.556 93.185,72.263 80.543,72.263 C35.1 ; BUZZER.P 106.761,37.941 J5.P2 109.816,38.241 110.109,38.534 110.109,48.983 109.816,49.276 68.119,49.276 67.827,49.569 L2.2 64.682,55.398 64.389,55.69 64.389,68.002 64.682,68.295 81.622,68.295 81.915,68.002 81.915,66.249 R12.1 82.111,66.363 82.892,66.363 83.185,66.655 83.185,71.081 82.892,71.374 80.608,71.374 C35.1
  other v1: 71.456,94.254
+12: +.1 -.1 C6.1 C9.2 D3.2 R15.2 U7.8 | length 64
  Top Layer w0.5: C6.1@102.515,90.991 C6.1
  Top Layer w0.8: U7.8@74.422,69.85 U7.8 79.668,69.85 80.137,70.319 R15.2 80.137,78.728 80.606,79.197 91.866,79.197 92.335,79.666 D3.2@92.335,81.645 ; -.1 86.741,84.67 87.21,84.201 91.866,84.201 92.335,83.732 D3.2@92.335,81.645 ; +.1 94.573,90.991 94.715,90.85 94.715,82.113 94.246,81.645 D3.2@92.335,81.645 ; +.1@94.923,90.991 97.274,90.991 C6.1@102.515,90.991
+12_LOAD: C7.2 C18.2 C22.1 C23.2 C25.1 C26.2 C28.1 C29.2 MOTOR1.01 MOTOR2.01 MOTOR3.01 R15.1 U3.7 U6.7 U7.7 | length 260.7
  Top Layer w0.8: MOTOR3.01 28.735,84.549 30.802,84.549 31.904,83.447 C23.2 34.036,89.066 33.567,89.535 C22.1@31.542,89.535 ; C22.1 30.607,92.876 31.076,93.345 36.83,93.345 39.878,96.393 ; v1@38.464,56.484 39.633,56.484 40.64,57.492 40.64,60.745 41.109,61.214 74.842,61.214 75.311,60.745 75.311,58.022 75.275,57.986 v1(75.275,55.263) 75.419,55.118 79.502,55.118 83.439,59.055 ; MOTOR2.01 53.586,100.047 C26.2 47.426,97.155 46.957,97.624 C25.1 46.452,100.841 44.326,100.841 39.878,96.393 ; U7.7 79.668,68.58 80.137,68.111 R15.1 ; MOTOR1.01 106.045,59.055 101.792,59.055 101.784,59.047 C29.2 101.727,53.014 102.196,52.545 C28.1 105.455,51.955 105.455,49.999 104.987,49.53 83.908,49.53 83.439,49.999 83.439,59.055 ; 39.878,96.393 39.878,72.478 40.347,72.009 65.063,72.009 65.532,71.54 65.532,63.842 66.001,63.373 79.668,63.373 80.137,63.842 R15.1 ; R15.1 82.97,66.472 83.439,66.003 83.439,59.055
  Bottom Layer w0.8: v1@38.464,56.484 38.464,55.379 38.284,55.199 C7.2 38.445,55.199 38.625,55.019 38.625,54.825 39.094,54.356 U3.7 ; v1(75.275,55.263) 75.419,55.118 77.212,55.118 77.243,55.087 C18.2 77.392,55.417 77.851,55.876 U6.7
  other v1: 38.464,56.564
BRAKE: MCU.30 MOTOR1.03 MOTOR2.03 MOTOR3.03 R32.1 | length 214.2
  Top Layer w0.254: MOTOR2.03 59.999,96.034 59.851,95.885 41.424,95.885 41.275,95.736 41.275,72.92 41.424,72.771 v1@65.913,72.771 ; R32.1 66.145,39.983 65.996,40.132 63.34,40.132 63.191,40.281 63.191,53.064 63.34,53.213 v1@82.3,53.213 ; v1(69.354,72.789) 69.354,80.265 v1@69.495,80.405 ; v1(96.418,65.587) 96.445,65.559 107.161,65.559 MOTOR1.03
  Top Layer w0.38: R32.1 66.153,36.735 67.977,36.735 MCU.30
  Bottom Layer w0.254: MOTOR3.03 v1(41.267,76.962) ; v1@65.946,72.819 65.961,72.804 69.339,72.804 v1(69.354,72.789) ; v1@69.495,80.405 96.23,80.405 96.418,80.218 v1(96.418,65.587) 96.418,53.386 96.244,53.213 82.321,53.213 v1@82.31,53.202
  other v1: 82.295,53.202 65.862,72.819 69.354,80.405
BUZZER: MCU.31 R16.1 R37.1 | length 42.5
  Top Layer w0.38: R37.1 66.332,35.34 67.868,35.34 MCU.31 67.994,35.448 69.709,35.448 v1(69.718,35.439)
  Bottom Layer w0.38: v1@69.723,35.434 69.723,30.187 69.946,29.964 99.166,29.964 99.388,30.187 R16.1
CHA1: MOTOR2.08 R20.1 | length 4.2
  Top Layer w0.38: MOTOR2.08 79.135,101.168 79.135,97.241 R20.1
CHA1_P: C12.1 R20.2 R26.2 Schmitt.1 | length 82.7
  Top Layer w0.38: v1(44.577,84.201) 44.038,84.201 43.815,84.424 43.815,90.074 44.038,90.297 49.925,90.297 50.148,90.074 C12.1 50.346,84.441 51.256,84.441 51.478,84.664 51.478,85.014 51.555,85.09 Schmitt.1 ; v1(77.12,94.254) 77.163,94.296 77.522,94.296 77.752,94.526 R26.2 R20.2
  Bottom Layer w0.38: v1(44.577,84.201) 45.243,84.201 45.466,83.978 45.466,81.122 45.243,80.899 42.799,80.899 42.418,81.28 42.418,95.758 42.672,96.012 73.437,96.012 73.66,95.789 73.66,94.528 73.934,94.254 v1(77.12,94.254)
CHA2: MOTOR3.08 R24.1 | length 6.8
  Top Layer w0.38: MOTOR3.08 28.702,56.611 29.025,56.288 R24.1
CHA2_P: C31.1 R24.2 R28.2 Schmitt.5 | length 90.6
  Top Layer w0.38: R24.2 R28.2 35.968,58.039 39.274,58.039 39.497,58.262 39.497,62.515 39.72,62.738 64.166,62.738 64.389,62.961 64.389,70.897 64.166,71.12 38.986,71.12 38.763,71.343 v1@38.763,78.742 ; v1(44.577,78.74) 50.069,78.74 50.292,78.963 50.292,79.986 50.316,80.01 Schmitt.5
  Bottom Layer w0.38: v1@38.763,78.742 38.765,78.741 v1(44.577,78.74) v1(44.577,78.74)
  other v1: 38.763,78.74
CHA3: MOTOR1.08 R23.2 | length 6
  Top Layer w0.38: R23.2 106.098,85.571 107.087,84.582 MOTOR1.08
CHA3_P: C32.1 R23.1 R29.2 Schmitt.11 | length 75.7
  Top Layer w0.38: Schmitt.11 C32.1 59.301,80.233 59.524,80.01 65.64,80.01 65.862,79.787 v1@65.862,78.775 ; v1(93.478,78.74) 96.678,78.74 96.901,78.963 96.901,86.561 97.124,86.784 108.997,86.784 109.22,86.561 109.22,83.172 108.997,82.949 105.125,82.949 104.902,83.172 104.902,83.878 104.679,84.101 R23.1 R29.2
  Bottom Layer w0.38: v1@65.862,78.775 65.88,78.758 93.46,78.758 v1(93.478,78.74)
  other v1: 65.862,78.74
CHB1: MOTOR2.07 R22.1 | length 4.5
  Top Layer w0.38: MOTOR2.07 75.239,100.87 76.073,100.036 76.073,97.182 R22.1
CHB1_P: C20.1 R22.2 R27.2 Schmitt.3 | length 58.7
  Top Layer w0.38: v1(44.577,82.697) 44.577,81.577 44.8,81.355 49.922,81.355 50.144,81.577 C20.1 50.266,82.55 Schmitt.3 ; v1(72.95,94.254) 72.95,95.281 73.173,95.504 R27.2 R22.2
  Bottom Layer w0.38: v1@44.584,82.697 44.541,82.74 43.53,82.74 43.307,82.962 43.307,95.154 43.53,95.377 72.727,95.377 72.95,95.154 v1(72.95,94.254)
CHB2: MOTOR3.07 R25.2 | length 5.9
  Top Layer w0.38: MOTOR3.07 28.956,61.468 28.956,61.056 29.179,60.833 R25.2
CHB2_P: C34.1 R25.1 R31.2 Schmitt.9 | length 70.7
  Top Layer w0.38: R31.2 35.689,59.359 34.04,59.359 R25.1 33.836,59.563 27.02,59.563 26.797,59.786 26.797,67.214 27.02,67.437 60.864,67.437 61.087,67.66 v1(61.087,70.231) ; Schmitt.9 57.342,78.742 C34.1@59.301,78.742 ; C34.1 59.301,77.82 59.524,77.597 62.348,77.597 62.571,77.82 v1(62.571,78.743)
  Bottom Layer w0.38: v1(61.087,70.231) 62.348,70.231 62.571,70.454 v1(62.571,78.743)
CHB3: MOTOR1.07 R21.2 | length 6.8
  Top Layer w0.38: R21.2 101.902,82.094 106.746,82.094 106.969,81.872 106.969,80.991 MOTOR1.07
CHB3_P: C33.1 R21.1 R30.2 Schmitt.13 | length 56.6
  Top Layer w0.38: Schmitt.13 C33.1@59.301,83.82 ; C33.1 59.301,82.646 59.585,82.362 v1@65.84,82.362 ; v1(82.296,76.962) 82.296,77.628 82.519,77.851 99.98,77.851 101.6,79.471 R21.1 R30.2
  Bottom Layer w0.38: v1(65.862,82.362) 65.247,82.362 65.024,82.139 65.024,77.185 65.247,76.962 v1(82.296,76.962)
DTR: "USB to UART.13" Q1.2 R6.1 | length 14.4
  Top Layer w0.254: Q1.2 55.267,59.69 55.118,59.541 55.118,51.054 55.372,50.8 58.086,50.8 58.269,50.617 58.269,50.441 58.418,50.292 R6.1@59.407,50.292
EN: C2.2 MCU.3 Q2.3 R2.2 RESET.2 | length 64.3
  Top Layer w0.254: Q2.3 57.531,41.656 v1(59.817,41.656) ; v1(83.343,29.039) 85.417,29.039 MCU.3 90.527,29.107 91.038,28.596 92.434,28.596 92.583,28.745 92.583,35.538 92.732,35.687 96.241,35.687 96.39,35.538 C2.2 R2.2@96.39,32.258 ; RESET.2 95.749,30.607 96.092,30.95 96.092,31.984 R2.2
  Bottom Layer w0.254: v1(59.817,41.656) 65.411,41.656 65.559,41.507 65.559,29.21 65.708,29.061 v1@83.334,29.061
ENC_A1: MCU.6 Schmitt.2 | length 79.9
  Top Layer w0.254: Schmitt.2 54.434,83.82 54.605,83.649 v1@54.605,75.953 ; v1(65.922,45.991) 69.981,45.991 70.129,45.843 70.129,39.011 70.278,38.862 81.41,38.862 81.559,38.713 81.559,35.43 v1(81.557,35.428) ; v1(81.557,32.947) 85.455,32.947 MCU.6
  Bottom Layer w0.254: v1@54.605,75.953 54.583,75.931 54.583,70.806 55.905,69.484 55.905,63.146 61.402,57.65 61.402,46.123 61.551,45.974 65.904,45.974 v1(65.922,45.991) ; v1(81.557,32.947) 81.569,32.958 81.569,35.417 v1(81.557,35.428)
  other v1: 54.605,75.95
ENC_A2: MCU.4 Schmitt.6 | length 77.5
  Top Layer w0.38: Schmitt.6 52.21,78.664 53.117,78.664 53.34,78.441 53.34,75.976 v1(53.314,75.95) ; v1(83.343,30.849) 83.402,30.849 83.644,30.607 85.255,30.607 MCU.4
  Bottom Layer w0.38: v1(53.314,75.95) 53.314,70.257 54.356,69.215 54.482,69.089 54.61,68.961 54.61,62.555 59.055,58.11 59.055,42.557 59.278,42.334 78.517,42.334 78.74,42.112 78.74,31.072 78.963,30.849 v1(83.343,30.849)
ENC_A3: MCU.8 Schmitt.10 | length 71.3
  Top Layer w0.38: v1(55.917,75.95) 55.917,79.784 56.142,80.01 Schmitt.10 ; v1(83.433,47.739) 83.921,47.739 84.144,47.516 v1(84.144,43.007) ; v1@84.099,35.428 84.114,35.443 85.471,35.443 MCU.8
  Bottom Layer w0.38: v1(55.917,75.95) 55.917,71.21 57.15,69.977 57.15,64.008 62.611,58.547 62.611,47.975 62.847,47.739 v1(83.433,47.739) ; v1@84.124,35.453 84.146,35.475 84.146,43.005 v1(84.144,43.007)
  other v1: 84.149,35.428
ENC_B1: MCU.7 Schmitt.4 | length 75.8
  Top Layer w0.254: v1(65.922,45.139) 69.559,45.139 69.708,44.99 69.708,38.503 69.857,38.354 80.369,38.354 80.518,38.205 80.518,34.465 80.796,34.187 MCU.7
  Top Layer w0.38: Schmitt.4 53.74,81.28 53.962,81.057 53.962,75.022 v1(53.957,75.017)
  Bottom Layer w0.254: v1(53.957,75.017) 53.957,71.34 53.975,71.321 53.975,70.533 55.303,69.205 55.303,62.885 60.779,57.408 60.779,45.287 60.928,45.139 v1(65.922,45.139)
ENC_B2: MCU.5 Schmitt.8 | length 75.9
  Top Layer w0.38: v1(56.562,75.017) 56.573,75.028 56.573,77.282 56.762,77.47 Schmitt.8 ; v1(83.343,31.706) 83.372,31.677 85.455,31.677 MCU.5 ; v1@83.443,48.574 83.479,48.61 84.613,48.61 84.836,48.387 v1@84.836,44.958
  Bottom Layer w0.38: v1(56.562,75.017) 56.562,71.454 57.785,70.231 57.785,64.413 63.311,58.887 63.311,48.864 63.601,48.574 v1@83.443,48.574 ; v1(83.343,31.706) 83.316,31.733 82.42,31.733 82.197,31.956 82.197,41.941 82.42,42.164 83.216,42.164 83.439,42.387 83.439,44.735 83.662,44.958 v1(84.868,44.958)
  other v1: 83.433,48.574
ENC_B3: MCU.9 Schmitt.12 | length 75.6
  Top Layer w0.38: v1(55.248,75.017) 55.245,75.02 55.245,82.327 55.468,82.55 Schmitt.12 ; v1(83.433,46.85) 83.391,46.808 83.391,46.652 83.383,46.644 83.383,42.648 82.169,41.433 82.169,36.926 82.392,36.703 84.549,36.703 84.573,36.727 MCU.9
  Bottom Layer w0.38: v1(55.248,75.017) 55.248,70.99 56.515,69.723 56.515,63.541 61.976,58.08 61.976,47.086 62.212,46.85 v1@83.402,46.85
ESP_RX: "USB to UART.2" MCU.34 | length 36.9
  Top Layer w0.254: 52.241,53.34 54.461,53.34 54.61,53.191 54.61,32.534 54.759,32.385 v1@61.359,32.385 ; v1@63.365,31.647 MCU.34
  Bottom Layer w0.254: v1(61.333,32.474) 62.603,32.474 v1(63.365,31.712)
ESP_TX: "USB to UART.3" MCU.35 | length 36.6
  Top Layer w0.254: 52.241,52.07 53.928,52.07 54.076,51.921 54.076,31.642 54.225,31.493 v1(61.333,31.493) ; v1@63.373,30.734 63.5,30.607 67.755,30.607 MCU.35
  Bottom Layer w0.254: v1(61.333,31.493) 62.569,31.493 v1(63.365,30.696)
GND: "BAT 1S.2" "IMU PCB.03" "USB to UART.1" BOOT.1 C1.1 C2.1 C3.1 C4.1 C5.1 C6.2 C7.1 C9.1 C10.1 C11.1 C12.2 C13.2 C14.2 C15.1 C16.1 C17.2 C18.1 C20.2 C21.1 C22.2 C23.1 C24.1 C25.2 C26.1 C27.1 C28.2 C29.1 C30.1 C31.2 C32.2 C33.2 C34.2 C35.2 C36.2 C37.1 CR1.2 CR2.2 D1.C D2.C D3.1 J1.A1_B12 J1.B1_A12 J1.SH1 J1.SH2 J1.SH3 J1.SH4 MCU.1 MCU.15 MCU.38 MCU.39_1 MCU.39_2 MCU.39_3 MCU.39_4 MCU.39_5 MCU.39_6 MCU.39_7 MCU.39_8 MCU.39_9 MOTOR1.02 MOTOR2.02 MOTOR3.02 Q3.2 R1.1 R3.2 R10.2 R14.2 R32.2 R33.2 R34.2 R35.2 R36.2 R37.2 R38.2 R39.2 RESET.1 Schmitt.7 U3.6 U3.9 U4.1 U6.6 U6.9 U7.1 U7.2 U7.6 XT-60.2 | length 15.5
  Top Layer w0.254: v1(63.652,35.156) 64.678,35.156 R37.2 ; R32.2@64.613,36.68 R32.2 ; MCU.39_3 MCU.39_6 MCU.39_9 MCU.39_8 MCU.39_5 MCU.39_2 MCU.39_1 MCU.39_4 MCU.39_7 ; R36.2 88.869,37.723 R38.2 88.876,39.304 R39.2
  other v1: 73.025,32.766 74.041,32.766 75.057,32.766 73.025,33.782 75.057,33.782 73.025,34.798 75.057,34.798 94.869,35.11 73.025,35.814 74.041,35.814 75.057,35.814 98.298,37.941 94.869,46.484 65.922,49.38 65.922,51.539 88.646,62.103 90.932,62.103 93.218,62.103 88.646,64.008 90.932,64.008 93.218,64.008 88.646,65.786 90.932,65.786 93.218,65.786 52.132,75.95 44.577,80.137 62.357,81.153 72.263,83.439 74.422,83.439 76.581,83.439 62.357,83.566 76.581,85.344 72.263,85.471 74.422,85.471 72.263,87.376 74.422,87.376 76.581,87.376
IO0: BOOT.2 C3.2 MCU.25 Q1.3 R4.2 | length 65.4
  Top Layer w0.254: Q1.3 57.234,57.574 58.244,57.574 v1(59.852,55.966) ; v1(65.922,43.085) 67.977,43.085 MCU.25 ; v1(86.834,47.368) 96.879,47.368 97.028,47.219 97.028,45.22 C3.2 ; BOOT.2 95.955,42.277 96.506,42.277 97.016,42.787 97.016,43.673 R4.2 97.001,44.874 C3.2@96.959,44.916
  Bottom Layer w0.254: v1(59.852,55.966) 59.852,43.234 60.001,43.085 v1(65.922,43.085) 82.401,43.085 82.55,43.234 82.55,45.825 82.699,45.974 86.686,45.974 86.834,46.123 v1(86.834,47.368)
NetC8_1: C8.1 CR1.1 L1.1 U3.8 | length 39.9
  Bottom Layer w0.38: CR1.1 35.132,59.721 35.355,59.944 40.879,59.944 41.101,60.167 41.101,65.055 41.324,65.278 47.802,65.278 L1.1 47.294,63.5 42.594,63.5 42.371,63.277 42.371,57.285 C8.1 40.943,57.277 40.72,57.054 40.72,55.736 40.61,55.626 U3.8 U3.8@39.991,55.626 ; CR1.1@35.719,55.601 35.768,55.65 CR1.1@35.768,56.173
NetC8_2: C8.2 U3.1 | length 3.4
  Bottom Layer w0.38: C8.2 45.546,57.277 45.833,56.99 U3.1
NetC19_1: C19.1 CR2.1 L2.1 U6.8 | length 43.3
  Bottom Layer w0.38: C19.1 75.004,57.563 75.227,57.34 U6.8 76.471,57.23 76.471,56.611 76.248,56.388 72.994,56.388 72.771,56.611 72.771,65.275 72.548,65.498 L2.1 67.827,62.826 67.944,62.708 68.072,62.58 71.405,62.58 71.628,62.358 71.628,52.389 71.851,52.166 CR2.1@76.456,52.166
NetC19_2: C19.2 U6.1 | length 3.4
  Bottom Layer w0.38: C19.2 75.004,62.518 75.227,62.74 U6.1
NetD1_A: D1.A R18.2 | length 1.7
  Top Layer w0.38: R18.2 D1.A
NetD2_A: D2.A R11.2 | length 11.9
  Bottom Layer w0.38: D2.A 62.769,33.371 62.992,33.594 R11.2
NetF1_2: +.2 -.2 XT-60.1 | length 10.3
  Top Layer w0.5: +.2 +.2@93.934,95.272
  Top Layer w0.8: -.2 +.2 ; +.2@93.934,95.272 XT-60.1
NetJ1_A5: J1.A5 R1.2 | length 2.9
  Top Layer w0.254: v1(29.845,46.228) 29.855,46.218 31.278,46.218 J1.A5
  Bottom Layer w0.254: R1.2 28.399,46.228 v1(29.845,46.228)
NetJ1_B5: J1.B5 R3.1 | length 2.9
  Top Layer w0.254: v1(29.845,43.18) 30.526,43.18 30.531,43.185 31.265,43.185 J1.B5
  Bottom Layer w0.254: R3.1 28.4,43.18 v1(29.845,43.18)
NetJ5_P1: BUZZER.N J5.P1 R19.2 | length 5.3
  Bottom Layer w0.38: R19.2 107.058,33.944 J5.P1
NetQ1_1: Q1.1 R5.2 | length 10.2
  Top Layer w0.254: Q1.1 60.784,59.69 60.933,59.541 R5.2@60.933,52.324
NetQ2_1: Q2.1 R6.2 | length 9.3
  Top Layer w0.254: Q2.1 58.293,43.815 60.784,43.815 60.933,43.964 R6.2@60.933,50.165
NetQ3_1: Q3.1 R16.2 | length 1.7
  Bottom Layer w0.38: Q3.1 99.386,37.148 99.386,35.409 R16.2
NetQ3_3: Q3.3 R19.1 | length 2.7
  Bottom Layer w0.38: R19.1 101.776,35.421 101.776,38.092 Q3.3
NetR7_2: R7.2 R8.1 U3.4 | length 3.6
  Bottom Layer w0.38: U3.4 45.847,51.802 47.766,51.802 R7.2 ; R7.2 R8.1@47.781,53.433
NetR8_2: R8.2 R10.1 | length 1.7
  Bottom Layer w0.38: R8.2 49.284,53.467 50.88,53.467 R10.1
NetR12_2: R12.2 R13.1 U6.4 | length 3.7
  Bottom Layer w0.38: U6.4 80.391,64.652 R13.1 80.518,64.738 R12.2
NetR13_2: R13.2 R14.1 | length 1.7
  Bottom Layer w0.38: R14.1 R13.2
POWER: C14.1 C15.2 POWER.2 U4.3 | length 18.2
  Bottom Layer w0.5: C14.1 48.491,40.184 48.821,39.854 48.821,39.768 49.114,39.475 C15.2 52.027,39.475 52.32,39.182 U4.3 52.32,32.297 52.613,32.004 55.968,32.004 56.261,31.711 POWER.2
PWM1: MCU.10 MOTOR2.04 R36.1 | length 192.7
  Top Layer w0.254: MOTOR2.04 63.809,95.145 63.661,94.996 42.186,94.996 42.037,94.847 42.037,73.738 42.186,73.59 64.785,73.59 64.794,73.598 65.039,73.598 v1(65.105,73.665) ; v1(68.535,81.092) 68.535,73.705 v1@68.58,73.66 ; R36.1 87.403,36.598 87.552,36.449 99.165,36.449 99.314,36.598 99.314,41.91 99.568,42.164 108.431,42.164 108.579,42.313 108.579,48.556 109.318,49.295 109.318,63.822 109.169,63.97 97.193,63.97 v1(97.179,63.985)
  Top Layer w0.38: MCU.10 85.497,37.985 87.391,37.985 R36.1@87.403,37.973
  Bottom Layer w0.254: v1(65.105,73.665) 65.109,73.66 68.53,73.66 v1(68.535,73.665) ; v1(68.535,81.092) 68.546,81.104 97.03,81.104 97.179,80.955 v1(97.179,63.985)
PWM2: MCU.11 MOTOR3.04 R38.1 | length 140.3
  Top Layer w0.254: MOTOR3.04 25.93,73.152 25.781,73.003 25.781,50.695 25.93,50.546 28.172,50.546 28.321,50.397 28.321,37.487 28.47,37.338 47.603,37.338 47.752,37.189 47.752,26.379 47.901,26.231 64.622,26.231 v1@64.643,26.251 ; v1(91.813,29.176) 91.817,29.18 91.817,33.651 v1(91.821,33.655)
  Top Layer w0.38: v1@83.439,39.243 85.461,39.243 MCU.11 85.518,39.3 87.396,39.3 R38.1
  Bottom Layer w0.254: v1@64.762,26.251 91.529,26.251 91.821,26.543 91.821,29.168 v1(91.813,29.176) ; v1(83.451,39.248) 83.451,33.842 83.638,33.655 v1(91.821,33.655)
  other v1: 64.63,26.251
PWM3: MCU.12 MOTOR1.04 R39.1 | length 78.1
  Top Layer w0.254: MOTOR1.04 109.81,69.342 109.959,69.193 109.959,48.933 109.422,48.396 v1(109.353,48.396)
  Top Layer w0.38: v1(82.837,40.497) 82.858,40.517 85.465,40.517 85.587,40.639 87.167,40.639 R39.1
  Bottom Layer w0.254: v1(82.837,40.497) 82.804,40.463 82.804,33.042 82.953,32.893 93.196,32.893 93.345,33.042 93.345,48.271 93.494,48.419 109.329,48.419 v1(109.353,48.396)
ROTATION1: MCU.26 MOTOR2.05 R33.1 | length 194.5
  Top Layer w0.254: v1(64.33,74.444) 64.303,74.416 42.948,74.416 42.799,74.565 42.799,93.958 42.948,94.107 67.471,94.107 67.619,94.256 MOTOR2.05 ; v1(67.734,74.444) v1@67.734,81.798 ; MCU.26 R33.1 66.142,40.789 65.993,40.64 63.776,40.64 63.627,40.789 63.627,52.175 63.776,52.324 82.276,52.324 v1(82.295,52.306)
  Bottom Layer w0.254: v1@64.33,74.556 64.386,74.5 67.678,74.5 v1(67.734,74.444) ; v1@67.707,81.825 97.768,81.825 97.917,81.676 97.917,52.454 97.768,52.306 v1(82.295,52.306)
  other v1: 67.734,81.825
ROTATION2: MCU.16 MOTOR3.05 R34.1 | length 118
  Top Layer w0.254: MOTOR3.05 26.438,69.342 26.289,69.193 26.289,51.203 26.438,51.054 28.68,51.054 28.829,50.905 28.829,37.995 28.978,37.846 48.111,37.846 48.26,37.697 48.26,27.2 48.409,27.051 64.6,27.051 v1(64.63,27.081) ; v1(71.366,27.081) v1(71.366,30.823) ; v1@71.374,39.774 71.374,41.38 71.523,41.529 80.899,41.529 81.18,41.81 MCU.16 81.153,44.354 R34.1
  Bottom Layer w0.254: v1(64.63,27.081) v1(71.366,27.081) v1@71.374,27.081 ; v1(71.366,39.84) 71.366,30.869 v1@71.374,30.861
ROTATION3: MCU.13 MOTOR1.05 R35.1 | length 98.1
  Top Layer w0.254: MCU.13 85.588,41.91 87.354,41.91 87.503,42.059 87.503,46.714 87.652,46.863 93.069,46.863 93.218,46.714 93.218,40.789 93.069,40.64 90.617,40.64 90.468,40.491 R35.1 98.066,39.265 98.425,39.624 98.425,48.238 98.574,48.387 107.547,48.387 108.63,49.469 108.63,63.108 108.481,63.257 95.78,63.257 95.631,63.406 95.631,73.003 95.78,73.152 MOTOR1.05
RTS: "USB to UART.14" Q2.2 R5.1 | length 25.7
  Top Layer w0.254: Q2.2 55.521,44.069 55.372,43.92 55.372,41.17 55.521,41.021 61.671,41.021 61.82,41.17 61.82,51.286 61.671,51.435 59.612,51.435 59.463,51.584 R5.1@59.463,52.324 ; 57.741,52.07 58.086,52.07 58.34,52.324 R5.1@59.463,52.324 ; R5.1 R5.1@59.463,52.324
SCL: MCU.36 R17.2 U7.4 | length 95.5
  Top Layer w0.254: R17.2 66.169,29.956 66.02,30.105 62.412,30.105 62.263,30.254 62.263,54.187 62.412,54.336 80.883,54.336 81.543,54.996 v1(82.295,54.996) ; U7.4 73.025,66.04 73.279,66.294 73.279,74.654 73.428,74.803 v1@78.867,74.803 ; v1@84.328,54.991 84.34,55.003 v1(84.34,74.808)
  Top Layer w0.38: R17.2 66.175,29.1 67.978,29.1 MCU.36
  Bottom Layer w0.254: v1(78.879,74.808) 84.323,74.808 v1@84.328,74.803 ; v1(82.295,54.996) v1(84.378,54.996)
SDA: MCU.33 R9.1 U7.3 | length 92.9